# Altium PCB PCB_DBS_Module-v1.0.PcbDoc (part 1 of 4)
Units mil, origin at the board's own origin, x right, y up, seen from the top; angles counter-clockwise.
Board outline 5571 x 4173 mil, 4 copper layers (Top Layer, PWR + Signal, GND + Signal, Bottom Layer), stack 61.653 mil thick; 149 components, 108 nets, 494 pads, 359 vias.
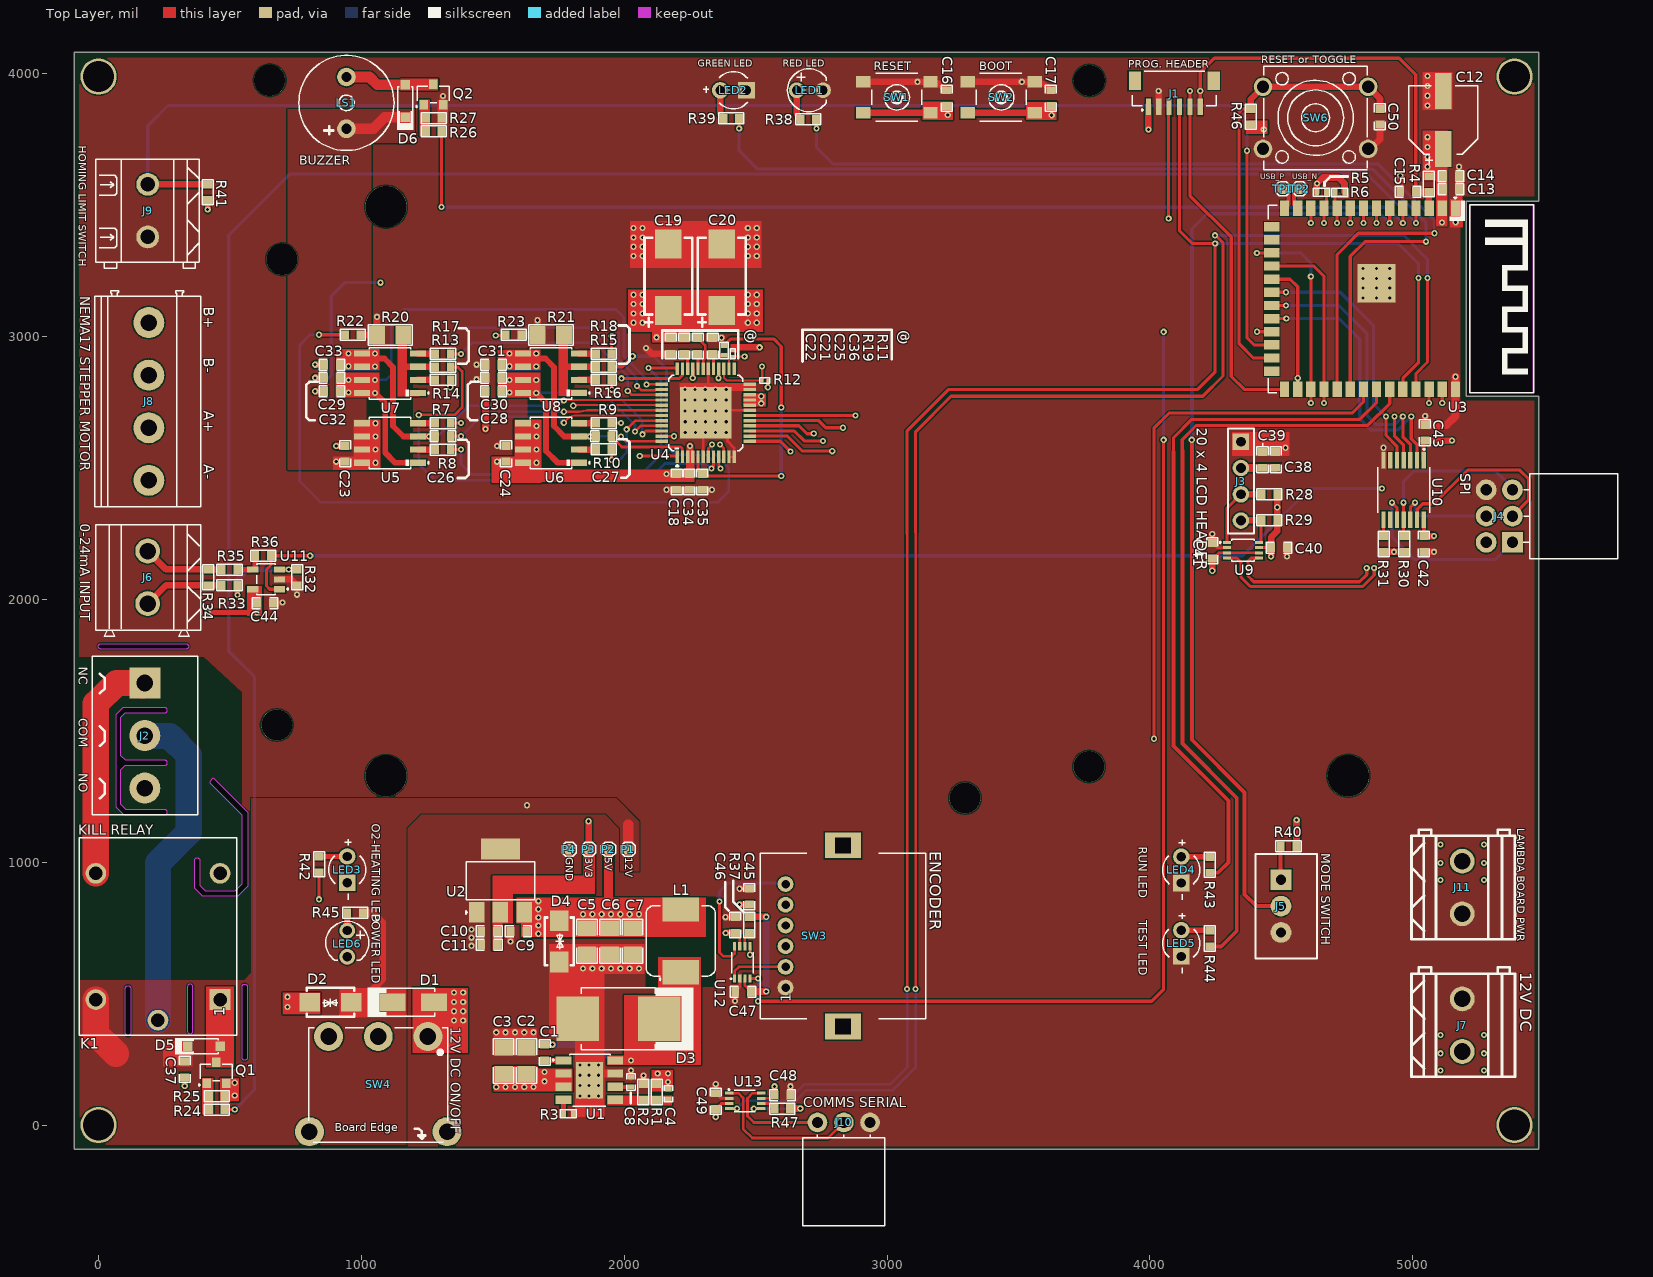
[diagram p0: Top Layer view]
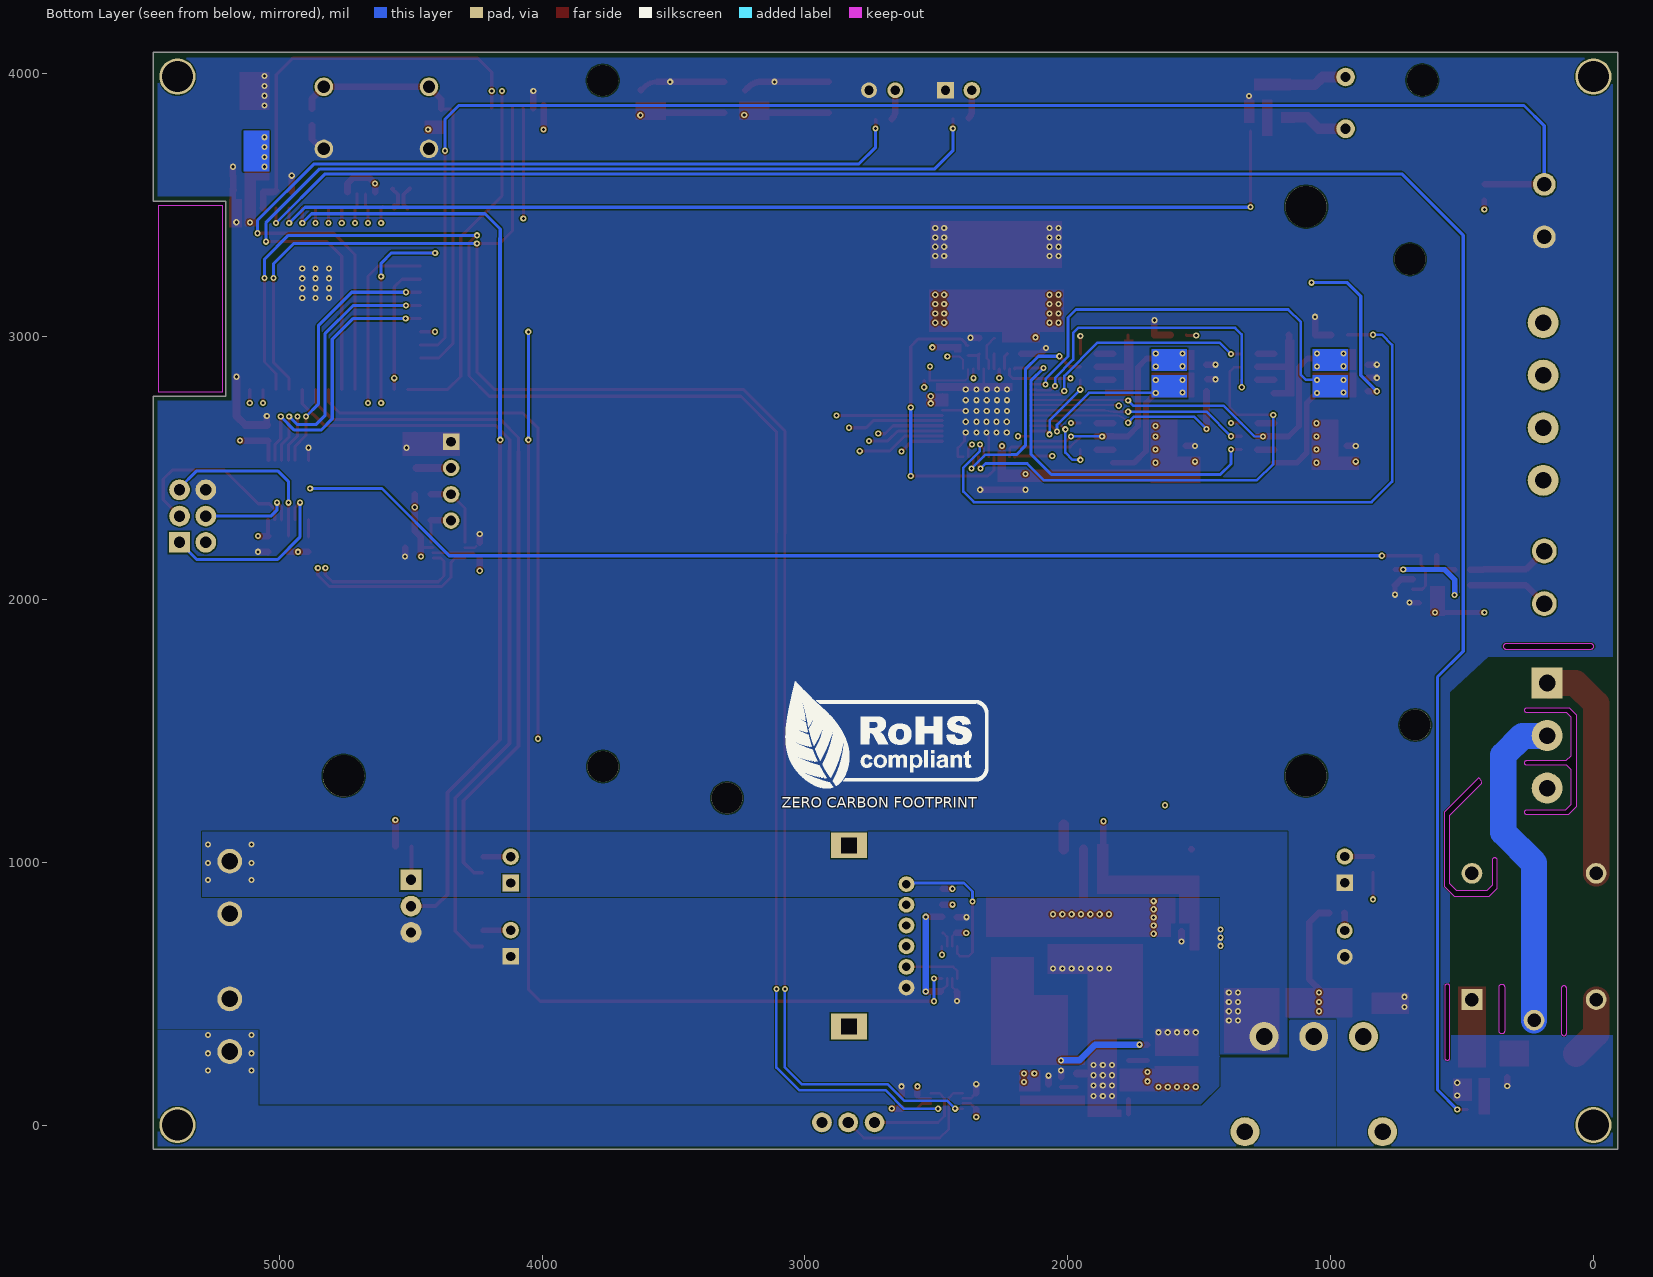
[diagram p1: Bottom Layer view, seen from below]
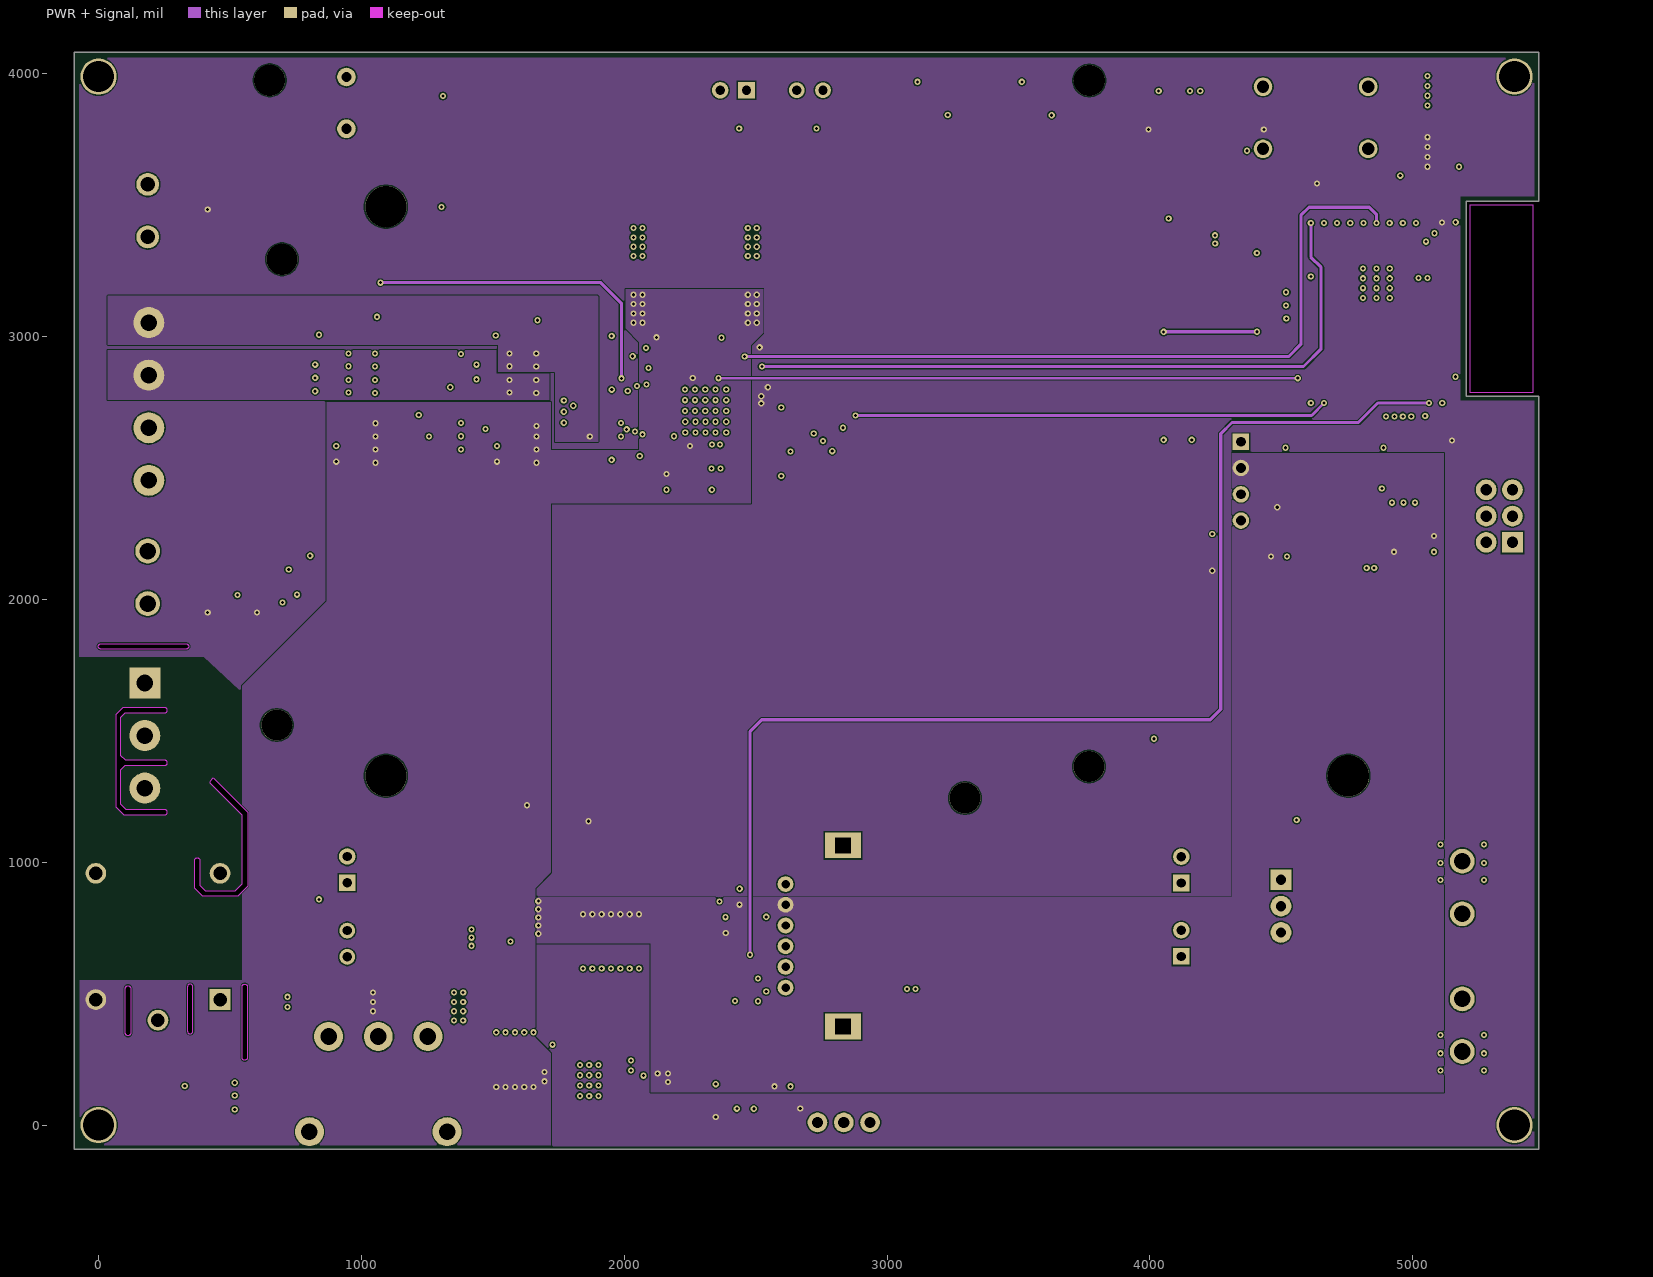
[diagram p2: PWR + Signal]
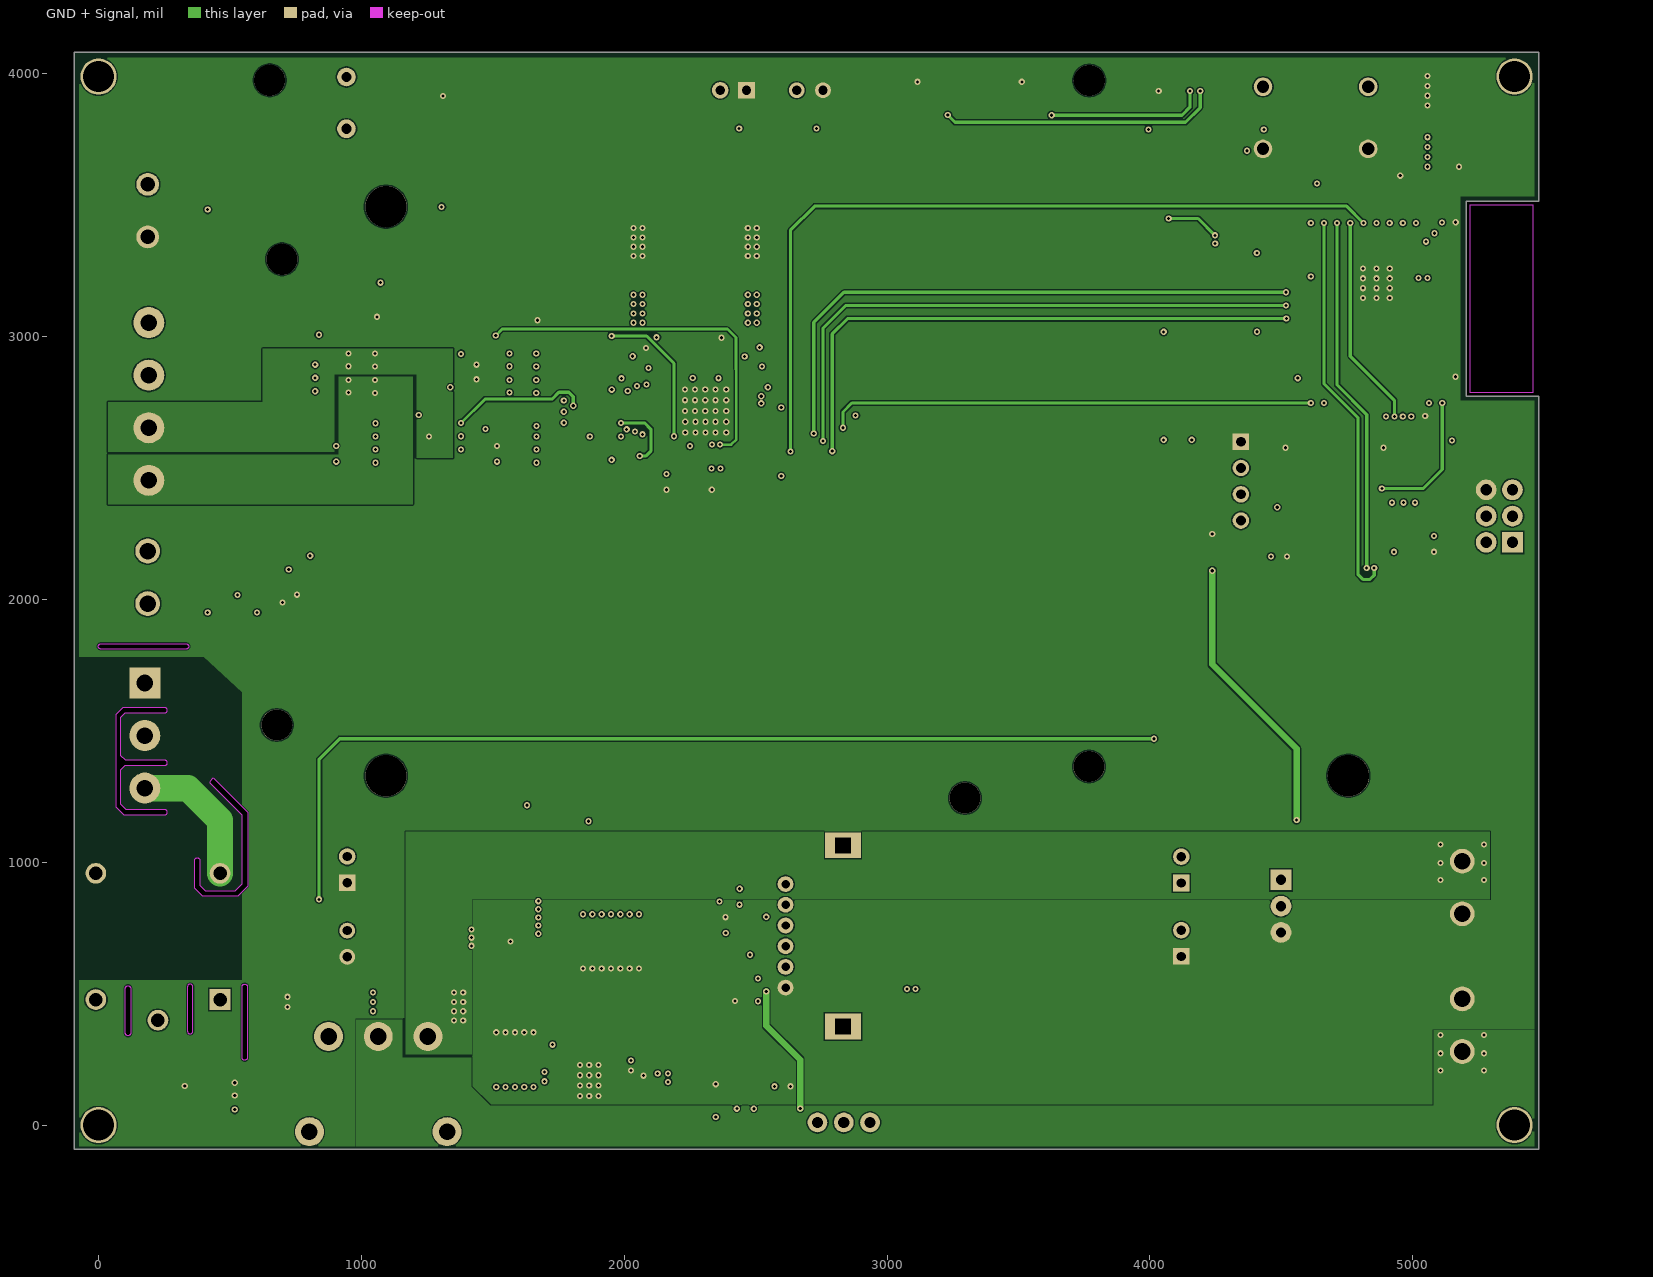
[diagram p3: GND + Signal]
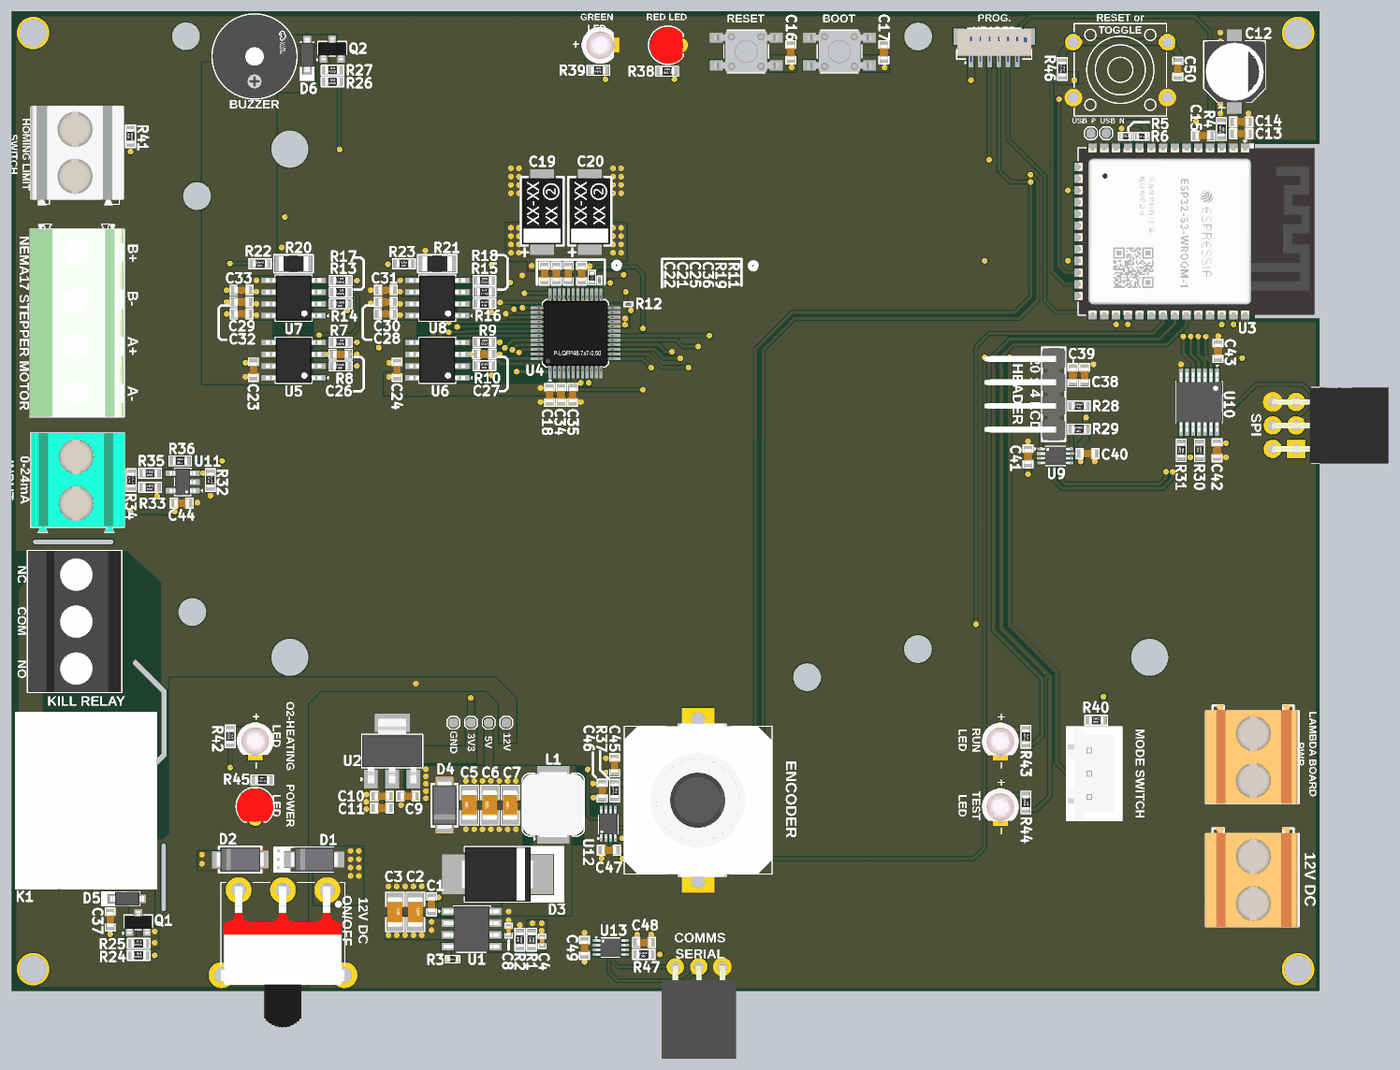
[diagram p5: 3D render of the assembled board from above, using the file's embedded part models]

## Layer stack, top to bottom
Top Solder: solder mask 0.709, Solder Resist, Dk 3.5
Top Layer: signal copper 1.378
Dielectric 2: prepreg 7.992, PP-006, Dk 4.4
PWR + Signal: signal copper 1.181
Dielectric 1: core 40.551, FR-4, Dk 4.6
GND + Signal: signal copper 1.181
Dielectric 3: prepreg 7.992, PP-006, Dk 4.4
Bottom Layer: signal copper 1.378
Bottom Solder: solder mask 0.709, Solder Resist, Dk 3.5

## Board outline
-92,-92 -92,4081 5479,4081 5479,3515 5204,3515 5204,2773 5479,2773 5479,-92
cut-out: 396,871 365.23,901.77 365.23,1006.95 cw(c375.23,1006.95) 375.23,1016.95 cw(c375.23,1006.95) 385.23,1006.95 385.23,912 405.23,892 520,892 545.77,917.77 545.77,1178.81 423.98,1300.59 cw(c444.24,1300.59) 429.92,1314.92 436.5,1321.5 568,1190 568,909 530,871
cut-out: 85.17,1220.83 85.17,1352.17 101.17,1368.17 251.76,1368.17 ccw(c251.76,1378.17) 261.76,1378.17 ccw(c251.76,1378.17) 251.76,1388.17 103,1388.17 85.17,1406 85.17,1552.17 101.17,1568.17 251.76,1568.17 ccw(c251.76,1578.17) 261.76,1578.17 ccw(c251.76,1578.17) 251.76,1588.17 92.17,1588.17 65.17,1561.17 65.17,1210.83 95.83,1180.17 251.76,1180.17 ccw(c251.76,1190.17) 261.76,1190.17 ccw(c251.76,1190.17) 251.76,1200.17 105.83,1200.17
cut-out: 555.77,246.59 cw(c555.77,256.59) 545.77,256.59 545.77,526.64 cw(c555.77,526.64) 555.77,536.64 cw(c555.77,526.64) 565.77,526.64 565.77,256.59 cw(c555.77,256.59)
cut-out: 348.23,536.64 ccw(c348.23,526.64) 338.23,526.64 338.23,356.59 ccw(c348.23,356.59) 348.23,346.59 ccw(c348.23,356.59) 358.23,356.59 358.23,526.64 ccw(c348.23,526.64)
cut-out: 112.01,340 cw(c112.01,350) 102.01,350 102.01,520.05 cw(c112.01,520.05) 112.01,530.05 cw(c112.01,520.05) 122.01,520.05 122.01,350 cw(c112.01,350)
cut-out: 8.95,1810.99 cw(c8.95,1820.99) -1.05,1820.99 cw(c8.95,1820.99) 8.95,1830.99 333,1830.99 cw(c333,1820.99) 343,1820.99 cw(c333,1820.99) 333,1810.99

## Design rules (kind name [scope] priority, off if disabled: settings)
BoardOutlineClearance [All] p1: gap=0 ignorepadtopadclearanceinfootprint=FALSE except(10: Poly-OutlineEdge)
Clearance [All] p1: gap=5 ignorepadtopadclearanceinfootprint=FALSE except(4: Arc-SMDPad Track-SMDPad SMDPad-SMDPad)
ComponentClearance [All] p1: gap=5 collisioncheckmode=3 verticalgap=5 showdistances=FALSE
DiffPairsRouting [All] p1: maxlimit=5 minlimit=5 mostfreqgap=5 toplayer_minwidth=8.69 toplayer_maxwidth=8.69 toplayer_prefwidth=8.69 midlayer1_minwidth=4.58 midlayer1_maxwidth=4.58 midlayer1_prefwidth=4.58 midlayer2_minwidth=4.58 midlayer2_maxwidth=4.58 midlayer2_prefwidth=4.58 bottomlayer_minwidth=8.69 bottomlayer_maxwidth=8.69 bottomlayer_prefwidth=8.69 impedanceprofiledriven=TRUE impedanceprofileid={7591B774-6EB5-4B82-8191-53E592D77F2E} impedanceprofilevalue=90.000000 maxuncoupledlength=500
Height [All] p1: minheight=0 maxheight=10000 prefheight=500
HoleSize [All] p1: absolutevalues=TRUE maxlimit=1000 minlimit=1 maxpercent=80.000 minpercent=20.000
HoleToHoleClearance [All] p1: gap=1 allowstackedmicrovias=TRUE
MatchedLengths "Schematic Matched Net Lengths" [InNetClass('USB_PROGRAM')] p1: tolerance=50 checknetsindiffpair=TRUE checkdiffpairvsdiffpair=FALSE checkxsignals=FALSE checkothers=FALSE
MaxMinImpedance "Schematic Impedance Constraint" [InNetClass('USB_PROGRAM')] p1: minimum=85.00 maximum=90.00
MinimumSolderMaskSliver [All] p1: minsoldermaskwidth=0
PolygonConnect [All] p1: connectstyle=Direct reliefconductorwidth=10 reliefentries=4 polygonreliefangle="90 Angle" airgapwidth=10
RoutingVias [All] p1: holewidth=11.81 width=23.62 viastyle="Through Hole" minholewidth=11.81 minwidth=23.62 maxholewidth=11.81 maxwidth=23.62
SilkToSilkClearance [All] p1: silktosilkclearance=0
SilkToSolderMaskClearance [IsPad] p1: minsilkscreentomaskgap=0 clearancetoexposedcopper=TRUE
SolderMaskExpansion SolderMaskExpansion_1 [IsVia] p1: expansion=4 istentingtop=FALSE soldermaskfromhole=TRUE
SolderMaskExpansion [Not IsVia] p2: expansion=4 istentingtop=FALSE
UnRoutedNet [All] p1: checkbadconnections=TRUE
Width [All] p1: maxlimit=100 minlimit=8 preferedwidth=12
21 further rules are at their usual default settings.

## Classes and differential pairs
differential pair class USB_PROGRAM_LINES: USB_D
net class USB_PROGRAM: USB_D_N USB_D_P
component class U_Stepper-Driver-Sheet: C18 C19 C20 C21 C22 C23 C24 C25 C26 C27 C28 C29 C30 C31 C32 C33 C34 C35 C36 R7 R8 R9 R10 R11 R12 R13 R14 R15 R16 R17 R18 R19 R20 R21 R22 R23 U4 U5 U6 U7 U8
component class U_Relay-Sheet: C37 D5 J2 K1 Q1 R24 R25
component class U_Power-Sheet: C1 C2 C3 C4 C5 C6 C7 C8 C9 C10 C11 D1 D2 D3 D4 L1 P1 P2 P3 P4 R1 R2 R3 U1 U2
component class U_Optical-Encoder-Sheet: C45 C46 C47 R37 SW3 U12
component class U_Controller-Sheet: C12 C13 C14 C15 C16 C17 J1 R4 R5 R6 SW1 SW2 TP1 TP2 U3
component class U_Connectors-SW-LEDs-Sheet: C48 C49 C50 J5 J7 J8 J9 J10 J11 LED1 LED2 LED3 LED4 LED5 LED6 R38 R39 R40 R41 R42 R43 R44 R45 R46 R47 SW4 SW6 U13
component class U_Buzzer-Sheet: D6 LS1 Q2 R26 R27
component class U_20x4-Display-Sheet: C38 C39 C40 C41 J3 R28 R29 U9
component class U_01M21V00-Sensor-Sheet: C42 C43 J4 R30 R31 U10
component class U_0-24mA-Input-Sheet: C44 J6 R32 R33 R34 R35 R36 U11
differential pair USB_D: +USB_D_P -USB_D_N

## Components (designator, comment, footprint, x,y, rotation, side; value= is the part's Value field where it differs from the comment)
C1 "100nF" Cap-0603 1697,276 r270 top locked
C2 "10uF" Cap-1206 1628,244 r270 top locked
C3 "10uF" Cap-1206 1541,244 r270 top locked
C4 "390pF" Cap-0402 2168,119 r90 top locked
C5 "47uF" Cap-1206 1858,699 r90 top locked
C6 "47uF" Cap-1206 1945,699 r90 top locked
C7 "47uF" Cap-1206 2032,699 r90 top locked
C8 "47nF" Cap-0402 2025,164 r270 top locked
C9 "1uF" Cap-0603 1597,737 r0 top locked
C10 "1uF" Cap-0603 1486,737 r0 top locked
C11 "4.7uF" Cap-0603 1486,686 r0 top locked
C12 "47uF" RVT1H470M0607 5116,3824.24 r90 top locked
C13 "22uF" Cap-0603 5145,3560 r180 top locked
C14 "100nF" Cap-0603 5145,3610 r180 top locked
C15 "1uF" Cap-0603 4982,3551 r0 top locked
C16 "100nF" Cap-0603 3227,3907 r90 top locked
C17 "100nF" Cap-0603 3623,3907 r90 top locked
C18 "100nF" Cap-0603 2199,2447 r90 top locked
C19 "100uF" Case-E 2168,3099 r90 top locked
C20 "100uF" Case-E 2371,3099 r90 top locked
C21 "100nF" Cap-0603 2228,2964 r270 top locked
C22 "100nF" Cap-0603 2177,2964 r270 top locked
C23 "470nF" Cap-0603 938,2554 r90 top locked
C24 "470nF" Cap-0603 1550,2554 r90 top locked
C25 "22nF" Cap-0603 2279,2964 r270 top locked
C26 "220nF" Cap-0603 1310,2620.5 r180 top locked
C27 "220nF" Cap-0603 1922,2621 r180 top locked
C28 "1nF" Cap-0603 1502,2843 r180 top locked
C29 "220nF" Cap-0603 888,2792 r0 top locked
C30 "220nF" Cap-0603 1502,2792 r0 top locked
C31 "1nF" Cap-0603 1502,2893 r180 top locked
C32 "1nF" Cap-0603 888,2843 r180 top locked
C33 "1nF" Cap-0603 888,2893 r180 top locked
C34 "2.2uF" CAP-0603 2248,2447 r90 top locked
C35 "2.2uF" CAP-0603 2297,2447 r90 top locked
C36 "0.47uF" Cap-0603 2336,2964 r270 top locked
C37 "100nF" Cap-0603 328,212 r270 top locked
C38 "22uF" Cap-0603 4478,2531 r270 top locked
C39 "100nF" Cap-0603 4428,2531 r270 top locked
C40 "100nF" Cap-0603 4491,2197 r0 top locked
C41 "100nF" Cap-0603 4237,2185 r90 top locked
C42 "100nF" Cap-0603 5042,2211 r270 top locked
C43 "100nF" Cap-0603 5046,2634 r90 top locked
C44 "100nF" Cap-0603 633,1986 r180 top locked
C45 "100nF" Cap-0603 2476,869 r90 top locked
C46 "100nF" Cap-0603 2423,761 r90 top locked
C47 "100nF" Cap-0603 2452,507 r180 top locked
C48 "100nF" Cap-0603 2602,114 r0 top locked
C49 "100nF" Cap-0603 2348,91 r90 top locked
C50 "100nF" Cap-0603 4875,3836 r270 top locked
D1 "SS56" SMA 1198,467 r0 top locked
D2 "SMAJ12CA" "SMA Bi Directional" 882,467 r0 top locked
D3 "B540C-13-F" SMC 1978,404 r180 top locked value=300pF
D4 "SMAJ5.0CA" "SMA Bi Directional" 1752,699 r90 top locked
D5 "1N4148W-7-F" SOD-123 401,300 r180 top locked value=2pF
D6 "1N4148W-7-F" SOD-123 1167,3896 r270 top locked value=2pF
J1 "Voltlink Target" "Voltlink Target" 4092.61,3923.3 r0 top locked
J2 "DB128L-5.08-3P-BK-S" DB128L-5.08-3P-BK-S 176,1482 r270 top locked
J3 "PZ2.54-1*4-WZ" PZ2.54-1*4-WZ 4346,2450 r270 top locked
J4 "PM254-2-03-W-8.5" "HDR 2x3 right angle Female (2.54mm)" 5329,2317 r90 top locked
J5 "B3B-XH-A(LF)(SN)" B3B-XH-A(LF)(SN)_ 4498.4,783 r270 top locked
J6 "DB128L-5.08-2P-GN-S" DB128L-5.08-2P-GN-S 187,2084 r90 top locked
J7 "DB128L-5.08-2P-OG-S" DB128L-5.08-2P-OG-S 5188,380 r270 top locked
J8 "DB128V-5.08-4P-GN-S" DB128V-5.08-4P-GN-S 191,2753 r270 top locked
J9 "DB128L-5.08-2P-GY-S" DB128L-5.08-2P-GY-S 187,3479 r270 top locked
J10 "PM254-1-03-W-8.5" "HDR 1x3 Female Right angle (2.54mm)" 2835,10 r0 top locked
J11 "DB128L-5.08-2P-OG-S" DB128L-5.08-2P-OG-S 5188,904 r270 top locked
K1 "HF3FA/012-ZSTF(136)(257)" HF3FA/012-ZSTF(136)(257) 225.78,678.47 r90 top locked
L1 "5.6uH" FXL0630-5R6-M 2215,701 r90 top locked
LED1 "RED" "TH LED Red 3MM" 2706,3937 r0 top locked
LED2 "Emerald" "TH LED 3mm_" 2415,3937 r180 top locked
LED3 "LTL17KFL5D-012A" "TH LED 3mm_" 946,972 r90 top locked
LED4 "Emerald" "TH LED 3mm_" 4119,971 r90 top locked
LED5 "LTL17KFL5D-012A" "TH LED 3mm_" 4119,691.56 r90 top locked
LED6 "RED" "TH LED Red 3MM" 946,690 r270 top locked
LS1 "FMB09A12-12V" FMB09A12-12V 943,3889 r90 top locked
P1 "TEST POINT 0.5mm Dia" "Test-point - 0.5mm" 2015,1050 r270 top locked
P2 "TEST POINT 0.5mm Dia" "Test-point - 0.5mm" 1940,1050 r270 top locked
P3 "TEST POINT 0.5mm Dia" "Test-point - 0.5mm" 1865,1050 r270 top locked
P4 "TEST POINT 0.5mm Dia" "Test-point - 0.5mm" 1790,1050 r270 top locked
Q1 "MMBT2222A-7-F" SOT-23 448,199 r0 top locked
Q2 "MMBT2222A-7-F" SOT-23 1274,3921 r0 top locked
R1 "68K" Res-0603 2123,126 r90 top locked
R2 "12K" Res-0603 2073,126 r270 top locked value=12kR
R3 "45.3k" Res-0402 1787,43 r180 top locked value=45.3kR
R4 "10K" Res-0603 5061,3580 r90 top locked
R5 "4.7K" Res-0402 4653,3549 r180 top locked
R6 "4.7K" Res-0402 4722,3549 r0 top locked
R7 "22R" Res-0603 1310,2671 r180 top locked
R8 "22R" Res-0603 1310,2570 r0 top locked
R9 "22R" Res-0603 1922,2671 r180 top locked
R10 "22R" Res-0603 1922,2571 r0 top locked
R11 "47K" Res-0201 2413,2935 r270 top locked value=47kR
R12 "47K" Res-0201 2535,2833 r180 top locked value=47kR
R13 "22R" Res-0603 1310,2934 r180 top locked
R14 "22R" Res-0603 1310,2835 r0 top locked
R15 "22R" Res-0603 1922,2934 r180 top locked
R16 "22R" Res-0603 1922,2836 r0 top locked
R17 "47R" Res-0603 1310,2884.5 r180 top locked
R18 "47R" Res-0603 1922,2885 r180 top locked
R19 "2.2R" Res-0402 2380,2947 r270 top locked
R20 "75mR" Res-1206 1109,3006 r0 top locked
R21 "75mR" Res-1206 1721,3006 r0 top locked
R22 "47R" Res-0603 967,3006 r0 top locked
R23 "47R" Res-0603 1579,3006 r0 top locked
R24 "470R" Res-0603 449.5,59 r180 top locked
R25 "10K" Res-0603 449.5,110 r180 top locked
R26 "470R" Res-0603 1275,3781 r180 top locked
R27 "10K" Res-0603 1275,3831 r180 top locked
R28 "10K" Res-0603 4454,2400 r0 top locked
R29 "10K" Res-0603 4454,2301 r0 top locked
R30 "10K" Res-0603 4967,2211 r270 top locked
R31 "10K" Res-0603 4889,2211 r90 top locked
R32 "100K" Res-0603 755,2084 r270 top locked
R33 "100K" Res-0603 498,2053 r0 top locked
R34 "120R" Res-0603 418,2084 r270 top locked
R35 "100K" Res-0603 498,2113 r0 top locked
R36 "100K" Res-0603 626,2166 r0 top locked
R37 "10K" Res-0603 2476,761 r90 top locked
R38 "130R" Res-0603 2700,3826 r180 top locked
R39 "15R" Res-0603 2407,3830 r180 top locked
R40 "10K" Res-0603 4527.28,1060.73 r0 top locked
R41 "10K" Res-0603 415,3549 r270 top locked
R42 "130R" Res-0603 839,992 r90 top locked
R43 "15R" Res-0603 4228,990 r90 top locked
R44 "130R" Res-0603 4228,710 r90 top locked
R45 "1.2K" Res-0603 976,807 r180 top locked
R46 "10K" Res-0603 4383,3836 r90 top locked
R47 "10K" Res-0603 2601,63 r0 top locked
SW1 "TS-1109S-C-B" TS-1109S-C-B 3037,3910 r180 top locked
SW2 "TS-1109S-C-B" TS-1109S-C-B 3434,3910 r180 top locked
SW3 "REC16B25-201-C" REC16B25-201-C 2832,720 r90 top locked
SW4 "SS-12D11G5R" SS-12D11G5R_ 1252.98,337 r180 top locked
SW6 "SKQBAQA010" SKQBAQA010 4630,3832 r0 top locked
TP1 "TEST POINT 0.5mm Dia" "Test-point - 0.5mm" 4505,3562 r0 top locked
TP2 "TEST POINT 0.5mm Dia" "Test-point - 0.5mm" 4570,3562 r0 top locked
U1 "LMR16030SDDAR" 8-SO-EP_ 1867,171 r0 top locked
U2 "LDL1117S33R" "SOT- 223" 1529,930.08 r0 top locked
U3 "ESP32-S3-WROOM-1-N8R2" "41-SMD Module" 4812.39,3143.49 r270 top locked
U4 "TMC2160A-TA-T" 48-TQFP-EP(7x7) 2309.84,2709.68 r90 top locked
U5 "AOSD62666E" SOIC-8 1109,2595 r180 top locked
U6 "AOSD62666E" SOIC-8 1721,2595 r180 top locked
U7 "AOSD62666E" SOIC-8 1109,2860 r180 top locked
U8 "AOSD62666E" SOIC-8 1721,2860 r180 top locked
U9 "TXS0102DCUR" VSSOP-8(3.1x2.1) 4354,2187 r0 top locked
U10 "TXU0304PWR" 14-TSSOP 4965,2416 r270 top locked
U11 "TP5591-TR" SOT-23-5 637,2076 r180 top locked
U12 "TXB0102DCUT" TXB0102DCUT 2449.16,618.98 r90 top locked
U13 "TXB0102DCUT" TXB0102DCUT 2460,92 r0 top locked

## Footprints (in the part's own frame and the unit in brackets; to place one, negate y for a bottom-side part, rotate by r counter-clockwise, add the part's x,y. Pads: shape width x height; smd on the part's side, far side on the other; paste and mask are expansions set on the pad)
8-SO-EP_ [mm]
  rect 1.505x0.802 smd: 1(-2.497,1.905) 2(-2.497,0.635) 3(-2.497,-0.635) 4(-2.497,-1.905) 5(2.498,-1.905) 6(2.498,-0.635) 7(2.498,0.635) 8(2.498,1.905)
  rect 2.613x3.502 smd: 9(0,0)
  silkscreen extent -3.53,-2.51 2.03,2.51, body extent -3,-2.45 3,2.45, height 1.7
14-TSSOP [mm]
  rect 1.57x0.41 smd: 1(-2.87,1.95) 2(-2.87,1.3) 3(-2.87,0.65) 4(-2.87,0) 5(-2.87,-0.65) 6(-2.87,-1.3) 7(-2.87,-1.95) 8(2.87,-1.95) 9(2.87,-1.3) 10(2.87,-0.65) 11(2.87,0) 12(2.87,0.65) 13(2.87,1.3) 14(2.87,1.95)
  silkscreen extent -3.98,-2.5 2.2,2.5, body extent -3.2,-2.5 3.2,2.5, height 1.2
"41-SMD Module" [mm]
  rect 1.5x0.9 smd: 1(-8.75,8.88) 2(-8.75,7.61) 3(-8.75,6.34) 4(-8.75,5.07) 5(-8.75,3.8) 6(-8.75,2.53) 7(-8.75,1.26) 8(-8.75,-0.01) 9(-8.75,-1.28) 10(-8.75,-2.55) 11(-8.75,-3.82) 12(-8.75,-5.09) 13(-8.75,-6.36) 14(-8.75,-7.63) 27(8.75,-7.63) 28(8.75,-6.36) 29(8.75,-5.09) 30(8.75,-3.82) 31(8.75,-2.55) 32(8.75,-1.28) 33(8.75,-0.01) 34(8.75,1.26) 35(8.75,2.53) 36(8.75,3.8) 37(8.75,5.07) 38(8.75,6.34) 39(8.75,7.61) 40(8.75,8.88)
  rect 0.9x1.5 smd: 15(-6.98,-8.88) 16(-5.71,-8.88) 17(-4.44,-8.88) 18(-3.17,-8.88) 19(-1.9,-8.88) 20(-0.63,-8.88) 21(0.64,-8.88) 22(1.91,-8.88) 23(3.18,-8.88) 24(4.45,-8.88) 25(5.72,-8.88) 26(6.99,-8.88)
  rect 3.7x3.7 smd: 41(-1.5,1.26)
  Keep-Out Layer region: -9.042,10.284 9.042,10.284 9.042,16.38 -9.042,16.38
  silkscreen extent -9.8,-9.2 9.09,16.43, body extent -9.01,-9.14 9.01,16.37, height 3.16
48-TQFP-EP(7x7) [mm]
  rect 1.22x0.32 smd: 1(-4.25,2.75) 2(-4.25,2.25) 3(-4.25,1.75) 4(-4.25,1.25) 5(-4.25,0.75) 6(-4.25,0.25) 7(-4.25,-0.25) 8(-4.25,-0.75) 9(-4.25,-1.25) 10(-4.25,-1.75) 11(-4.25,-2.25) 12(-4.25,-2.75) 25(4.25,-2.75) 26(4.25,-2.25) 27(4.25,-1.75) 28(4.25,-1.25) 29(4.25,-0.75) 30(4.25,-0.25) 31(4.25,0.25) 32(4.25,0.75) 33(4.25,1.25) 34(4.25,1.75) 35(4.25,2.25) 36(4.25,2.75)
  rect 0.32x1.22 smd: 13(-2.75,-4.25) 14(-2.25,-4.25) 15(-1.75,-4.25) 16(-1.25,-4.25) 17(-0.75,-4.25) 18(-0.25,-4.25) 19(0.25,-4.25) 20(0.75,-4.25) 21(1.25,-4.25) 22(1.75,-4.25) 23(2.25,-4.25) 24(2.75,-4.25) 37(2.75,4.25) 38(2.25,4.25) 39(1.75,4.25) 40(1.25,4.25) 41(0.75,4.25) 42(0.25,4.25) 43(-0.25,4.25) 44(-0.75,4.25) 45(-1.25,4.25) 46(-1.75,4.25) 47(-2.25,4.25) 48(-2.75,4.25)
  rect 5x5 smd: 49(0,0)
  silkscreen extent -5.16,-3.58 3.66,3.58, body extent -4.51,-4.51 4.49,4.49, height 1.43
B3B-XH-A(LF)(SN)_ [mm]
  rect 2x2 hole 1: 1(-3.81,0)
  round 2 hole 1: 2(-1.27,0) 3(1.27,0)
  silkscreen extent -6.32,-2.46 3.78,3.48, body extent -6.22,-2.36 3.68,3.39, height 7
Cap-0402 [mil]
  rect 18x25 smd mask+2.36: 1(-18.5,0) 2(18.5,0)
  silkscreen extent -31,-16 31,16, body extent -20,-10 20,10, height 19
Cap-0603 [mil]
  rect 30x35 smd mask+2.36: 1(-30,0) 2(30,0)
  silkscreen extent -49,-21 49,21, body extent -32,-16 31,16, height 34
CAP-0603 [mil]
  rect 30x35 smd mask+2.36: 1(-30,0) 2(30,0)
  silkscreen extent -49,-21 49,21, body extent -32,-16 31,16, height 34
Cap-1206 [mil] "SMD 1206"
  rect 60x70 smd: 1(-50,0) 2(50,0)
  silkscreen extent -84,-39 84,39, body extent -63,-31 63,32, height 39
Case-E [mm]
  rect 2.79x2.57 smd: 1(0,0) 2(6.44,0)
  silkscreen extent -1.56,-2.31 7.03,2.31, body extent -0.27,-2.21 6.92,2.21, height 2.88
DB128L-5.08-2P-GN-S [mm]
  round 2.4 hole 1.6: 1(-2.54,0) 2(2.54,0)
  silkscreen extent -5.7,-5.1 5.1,5, body extent -5.68,-5.12 5.08,4.88, height 14
DB128L-5.08-2P-GY-S [mm]
  round 2.2 hole 1.4 paste+0 mask+0.051: 1(-2.54,0) 2(2.54,0)
  silkscreen extent -4.99,-5 5.59,5, body extent -5.07,-5 5.7,5, height 14.1
DB128L-5.08-2P-OG-S [mm]
  round 2.4 hole 1.6 paste+0 mask+0.051: 1(-2.54,0) 2(2.54,0)
  silkscreen extent -5.59,-4.91 4.99,5.1, body extent -5.68,-4.98 5.08,5.02, height 14
DB128L-5.08-3P-BK-S [mm]
  rect 3x3 hole 1.6: 1(-5.08,0)
  round 3 hole 1.6: 2(0,0) 3(5.08,0)
  silkscreen extent -7.67,-5.08 7.67,5.13, body extent -7.59,-5.03 7.65,5.07, height 10.1
DB128V-5.08-4P-GN-S [mm]
  round 3 hole 1.6 paste+0 mask+0.05: 1(-7.62,0) 2(-2.54,0) 3(2.54,0) 4(7.62,0)
  silkscreen extent -10.72,-5.2 10.16,5, body extent -10.74,-5.25 10.15,4.95, height 14
FMB09A12-12V [mm]
  round 1.8 hole 1 copper offset 0,0 paste+0 mask+0.051: 1(-2.5,0)
  round 1.8 hole 1 paste+0 mask+0.051: 2(2.5,0)
  silkscreen extent -4.6,-4.6 4.6,4.6, body extent -4.5,-4.5 4.5,4.5, height 5.51
FXL0630-5R6-M [mm]
  rect 2.35x3.5 smd: 1(-3.025,0) 2(3.025,0)
  silkscreen extent -3.84,-3.35 3.4,3.35, body extent -3.5,-3.3 3.5,3.3, height 2.6
"HDR 1x3 Female Right angle (2.54mm)" [mm]
  round 1.9 hole 1.1 paste+0 mask+0.05: 1(-2.54,0) 2(0,0) 3(2.54,0)
  silkscreen extent -3.95,-10 3.95,-1.18, body extent -4.01,-9.93 4.02,0.22, height 2.5
"HDR 2x3 right angle Female (2.54mm)" [mm]
  rect 2x2 hole 1.1 paste+0 mask+0.05: 1(-2.54,-1.27)
  round 2 hole 1.1 paste+0 mask+0.05: 2(-2.54,1.27) 3(0,-1.27) 4(0,1.27) 5(2.54,-1.27) 6(2.54,1.27)
  silkscreen extent -4.11,-11.43 4.11,-2.34, body extent -4.12,-11.24 4.12,1.46, height 5
HF3FA/012-ZSTF(136)(257) [mm]
  rect 2x2 hole 1.3 paste+0 mask+0.051: 1(-5.1,-6)
  round 2 hole 1.3 paste+0 mask+0.051: 2(7.1,-6) 3(7.1,6) 4(-5.1,6) 5(-7.1,0)
  silkscreen extent -8.55,-7.62 10.55,7.62, body extent -8.5,-7.6 10.5,7.61, height 15.5
PZ2.54-1*4-WZ [mm]
  rect 1.6x1.6 hole 0.95: 1(-3.81,0)
  round 1.6 hole 0.95: 2(-1.27,0) 3(1.27,0) 4(3.81,0)
  silkscreen extent -5.08,-1.27 5.08,1.27, body extent -5.01,-7.47 5.02,1.27, height 4.34
REC16B25-201-C [mm]
  round 1.524 hole 0.82: 1(-5,5.55) 2(-3,5.55) 3(-1,5.55) 4(1,5.55) 5(3,5.55) 6(5,5.55)
  rect 2.5x3.5 hole 1.5 square: 7(-8.75,0) 7(8.75,0)
  silkscreen extent -8,-8 8,8, body extent -8.3,-7.95 8.3,8.05, height 35
Res-0201 [mm]
  rect 0.27x0.37 smd mask+0.055: 1(-0.275,0) 2(0.275,0)
  silkscreen extent -0.48,-0.25 0.48,0.25, body extent -0.3,-0.15 0.3,0.15, height 0.29
Res-0402 [mil]
  rect 18x25 smd mask+2.17: 1(-18.5,0) 2(18.5,0)
  silkscreen extent -32,-17 32,16, body extent -23,-11 23,11, height 16
Res-0603 [mil]
  rect 30x35 smd: 1(-30,0) 2(30,0)
  silkscreen extent -48,-21 48,21, body extent -31,-17 31,17, height 18
Res-1206 [mil]
  rect 60x70 smd: 1(-50,0) 2(50,0)
  silkscreen extent -84,-39 84,39, body extent -63,-31 63,31, height 24
RVT1H470M0607 [mm]
  rect 3.5x1.6 smd: 1(-2.8,0) 2(2.8,0)
  silkscreen extent -4.27,-3.33 3.32,3.33, body extent -3.31,-3.33 3.29,3.27, height 7.94
SKQBAQA010 [mm]
  round 1.8 hole 1.2 paste+0 mask+0.051: 1(-5.08,3) 2(5.08,3) 3(-5.08,-3) 4(5.08,-3)
  silkscreen extent -5,-5 5,5
SMA [mm]
  rect 2.5x1.7 smd: 1(-2,0) 2(2,0)
  silkscreen extent -4.44,-1.42 2.06,1.42, body extent -2.6,-1.3 2.6,1.3, height 2.4
"SMA Bi Directional" [mm]
  rect 2x1.8 smd paste+0 mask+0.051: 1(-2,0) 2(2,0)
  silkscreen extent -2.3,-1.4 2.3,1.4, body extent -2.6,-1.3 2.6,1.3, height 2.4
SMC [mm]
  rect 4.1x4.3 smd: 1(-3.95,0) 2(3.95,0)
  silkscreen extent -7.24,-3.05 3.58,3.05, body extent -3.9,-2.95 3.9,2.95, height 2.41
SOD-123 [mm]
  rect 0.95x0.9 smd: 1(-1.575,0) 2(1.575,0)
  silkscreen extent -1.37,-0.8 2.82,0.8, body extent -1.82,-0.78 1.83,0.78, height 1.5
SOIC-8 [mm]
  rect 1.55x0.6 smd: 1(-2.7,1.905) 2(-2.7,0.635) 3(-2.7,-0.635) 4(-2.7,-1.905) 5(2.7,-1.905) 6(2.7,-0.635) 7(2.7,0.635) 8(2.7,1.905)
  silkscreen extent -3.76,-2.49 1.99,2.49, body extent -3,-2.45 3,2.45, height 1.7
SOT-23 [mm] "TRANS NPN 40V 0.6A SOT23"
  rect 0.82x0.92 smd: 1(-0.95,-1) 2(0.95,-1) 3(0,1)
  silkscreen extent -1.68,-1.3 1.55,0.81, body extent -1.5,-1.25 1.5,1.25, height 1.05
SOT-23-5 [mm]
  rect 1.1x0.6 smd: 1(-1.3,0.95) 2(-1.3,0) 3(-1.3,-0.95) 4(1.3,-0.95) 5(1.3,0.95)
  silkscreen extent -2.13,-1.5 0.88,1.5, body extent -1.4,-1.45 1.4,1.45, height 1.45
"SOT- 223" [mm]
  rect 1.5x2 smd: 1(-2.3,-3.05) 2(0,-3.05) 3(2.3,-3.05)
  rect 3.8x2 smd: 4(0,3.05)
  silkscreen extent -3.35,-3.2 3.3,1.8, body extent -3.25,-3.5 3.25,3.5, height 1.61
SS-12D11G5R_ [mm]
  round 2.8 hole 1.6: 1(0,0) 2(4.8,0) 3(9.6,0) MH1(-1.85,9.2) MH2(11.45,9.2)
  silkscreen extent -1.91,-0.84 11.51,10.21, body extent -1.85,-0.79 11.5,14.9, height 6.85
"Test-point - 0.5mm" [mm]
  oct 1x1 smd: 1(0,0)
  silkscreen extent -0.68,-0.68 0.68,0.68
"TH LED 3mm_" [mm]
  rect 1.6x1.6 hole 0.9: 1(-1.27,0)
  round 1.6 hole 0.9: 2(1.27,0)
  silkscreen extent -1.37,-1.8 2.92,1.8, body extent -1.5,-2 2,2, height 6.25
"TH LED Red 3MM" [mil]
  round 60 hole 35.43 paste+0 mask+2: 1(-50,0) 2(50,0)
  silkscreen extent -85,-82 63,82, body extent -79,-80 61,78, height 205
TS-1109S-C-B [mm]
  rect 1.4x1.1 smd: 1(-3.25,-1.5) 2(3.25,-1.5) 3(3.25,1.5) 4(-3.25,1.5)
  silkscreen extent -2.41,-2.31 2.41,2.31, body extent -3.5,-2.25 3.5,2.25, height 4.3
TXB0102DCUT [mm]
  rect 0.8x0.3 smd: 1(-1.55,0.75) 2(-1.55,0.25) 3(-1.55,-0.25) 4(-1.55,-0.75) 5(1.55,-0.75) 6(1.55,-0.25) 7(1.55,0.25) 8(1.55,0.75)
  silkscreen extent -1.61,-1.04 0.97,1.13, body extent -1.55,-1 1.55,1, height 0.9
"Voltlink Target" [mm]
  rect 0.5x1.6 smd: 1(-2.5,-1.262) 2(-1.5,-1.262) 3(-0.5,-1.262) 4(0.5,-1.262) 5(1.5,-1.262) 6(2.5,-1.262)
  rect 1.2x1.8 smd: MP1(-3.8,1.262) MP2(3.8,1.262)
  silkscreen extent -4.06,-1.68 4.06,2.17, body extent -4,-1.49 4,2.11, height 4.25
VSSOP-8(3.1x2.1) [mm]
  rect 0.8x0.3 smd mask+0.05: 1(-1.55,0.75) 2(-1.55,0.25) 3(-1.55,-0.25) 4(-1.55,-0.75) 5(1.55,-0.75) 6(1.55,-0.25) 7(1.55,0.25) 8(1.55,0.75)
  silkscreen extent -2.24,-1.04 1.07,1.04, body extent -1.55,-1 1.55,1, height 0.88

## Part data
C1 C14 C16 C17 C18 C21 C22 C37 C39 C40 C41 C42 C43 C44 C45 C46 C47 C48 C49 C50: library part CC0603KRX5R9BB104, "CAP CER 0.1UF 50V X5R 0603", Case Code (Imperial)=0603, Case Code (Metric)=1608, Dielectric=X5R, LCSC Part Number=C110022, Manufacturer=Yageo, Max Operating Temperature=85°C, Min Operating Temperature=-55°C, Package Quantity=4000, Supplier Part Number 1=311-4046-1-ND, Tolerance=10%, Voltage Rating=50V, Capacitance=100nF, Case/Package=0603, Category="Ceramic Capacitors", ComponentLink1Description=http://www.mouser.com/ds/2/447/Yageo_UPY-GP_NP0_16V-to-50V_9-358835.pdf?src-supplier=Mouser, ComponentLink1URL=http://www.mouser.com/ds/2/447/Yageo_UPY-GP_NP0_16V-to-50V_9-358835.pdf?src-supplier=Mouser, ComponentLink2Description=https://www.yageo.com/upload/media/product/productsearch/datasheet/mlcc/UPY-GPHC_X5R_4V-to-50V_26.pdf?src-supplier=Digi-Key, ComponentLink2URL=https://www.yageo.com/upload/media/product/productsearch/datasheet/mlcc/UPY-GPHC_X5R_4V-to-50V_26.pdf?src-supplier=Digi-Key, ComponentLink3Description=http://www.yageo.com/exep/pages/download/literatures/ProductSelectionGuide%202014_Final_2.pdf?src-supplier=Digi-Key, ComponentLink3URL=http://www.yageo.com/exep/pages/download/literatures/ProductSelectionGuide%202014_Final_2.pdf?src-supplier=Digi-Key, Halogen Free="Halogen Free", Item Type=Capacitor, Lead Free="Lead Free", Length=0.063inch, Manufacturer Part Number=CC0603KRX5R9BB104, Mount="Surface Mount", Packaging="Tape and Reel", Pricing 1="1=0.10000, 10=0.05200, 50=0.02820, 100=0.02310, 500=0.01648, 1000=0.01294 (USD)", RoHS=Yes, Stock 1=152253, Supplier 1=Digi-Key, Termination=SMD/SMT, Thickness=0.035inch, Voltage Rating (DC)=50V, Weight=7.1E-05oz, Width=0.031inch
C2 C3: library part CC1206KKX5R9BB106, "CAP CER 10UF 50V X5R 1206", Case Code (Imperial)=1206, Case Code (Metric)=3216, Dielectric=X5R, LCSC Part Number=C100122, Manufacturer=Yageo, Max Operating Temperature=85°C, Min Operating Temperature=-55°C, Supplier Part Number=2072123, Tolerance=10%, Voltage Rating=50V, Case/Package=1206, ComponentLink1Description=https://datasheet.octopart.com/CC1206KKX5R9BB106-Yageo-datasheet-170350636.pdf?src-supplier=Future+Electronics, ComponentLink1URL=https://datasheet.octopart.com/CC1206KKX5R9BB106-Yageo-datasheet-170350636.pdf?src-supplier=Future+Electronics, ComponentLink2Description=https://datasheet.octopart.com/CC1206KKX5R9BB106-Yageo-datasheet-145016144.pdf?src-supplier=Future+Electronics, ComponentLink2URL=https://datasheet.octopart.com/CC1206KKX5R9BB106-Yageo-datasheet-145016144.pdf?src-supplier=Future+Electronics, ComponentLink3Description=http://www.yageo.com/documents/recent/UPY-GPHC_X5R_4V-to-50V_25.pdf?src-supplier=Digikey, ComponentLink3URL=http://www.yageo.com/documents/recent/UPY-GPHC_X5R_4V-to-50V_25.pdf?src-supplier=Digikey, Halogen Free="Halogen Free", Height=1.9mm, Item Type=Capacitors, Lead Free="Lead Free", Length=0.126inch, Manufacturer Part Number=CC1206KKX5R9BB106, Material=4241ConductorMaterial, Mounting Technology="Surface Mount", Packaging="Cut Tape", Pricing="2000=0.0907, 6000=0.0872, 10000=0.0856, 30000=0.0823, 50000=0.0795 (USD)", RoHS=Yes, RoHS Compliant=Yes, Series=CC, Stock=220000, Supplier="Future Electronics", Thickness=0.075inch, Voltage Rating (DC)=50V, Width=0.063inch
C4: library part CGA2B2C0G1H391J050BA, "CAP CER 390PF 50V C0G 0402", Manufacturer=TDK, Supplier Part Number=445-5603-1-ND, ComponentLink1Description=https://datasheet.ciiva.com/24219/cga2b2c0g1h391j050ba-265720-24219960.pdf?src-supplier=Mouser, ComponentLink1URL=https://datasheet.ciiva.com/24219/cga2b2c0g1h391j050ba-265720-24219960.pdf?src-supplier=Mouser, ComponentLink2Description=https://datasheet.ciiva.com/7975/1807242-7975259.pdf?src-supplier=Element14, ComponentLink2URL=https://datasheet.ciiva.com/7975/1807242-7975259.pdf?src-supplier=Element14, Item Type=Capacitors, Manufacturer Part Number=CGA2B2C0G1H391J050BA, Pricing="1=0.1, 10=0.048, 50=0.0278, 100=0.0216, 500=0.01622, 1000=0.01275, 2500=0.01159, 5000=0.01066 (USD)", RoHS=Yes, Stock=103846, Supplier=Digikey
C5 C6 C7: library part GRM31CR61E476ME44L, "CAP CER 47UF 25V X5R 1206", Dielectric=X5R, LCSC Part Number=C403725, Manufacturer=Murata, Supplier Part Number 1=490-16268-2-ND, Tolerance=20%, Voltage Rating (DC)=25V, Capacitance=47uF, Category="Ceramic Capacitors", ComponentLink1Description=https://search.murata.co.jp/Ceramy/image/img/A01X/partnumbering_e_01.pdf?src-supplier=Digi-Key, ComponentLink1URL=https://search.murata.co.jp/Ceramy/image/img/A01X/partnumbering_e_01.pdf?src-supplier=Digi-Key, Item Type=Capacitor, Length=3.2mm, Manufacturer Part Number=GRM31CR61E476ME44L, RoHS=Yes, Supplier 1=Digi-Key, Thickness=1.6mm, Width=1.6mm
C8: library part CC0402KRX7R9BB473, "CAP CER 0.047UF 50V X7R 0402", Case Code (Imperial)=0402, Case Code (Metric)=1005, Dielectric=1511DielectricType, LCSC Part Number=C272875, Manufacturer=Yageo, Max Operating Temperature=125°C, Min Operating Temperature=-55°C, Supplier Part Number=2095687, Temperature Coefficient=30ppm/°C, Tolerance=10%, Voltage Rating=50V, Case/Package=0402, Category="Ceramic Capacitors", ComponentLink1Description=https://datasheet.octopart.com/CC0402KRX7R9BB473-Yageo-datasheet-166511530.pdf?src-supplier=Future+Electronics, ComponentLink1URL=https://datasheet.octopart.com/CC0402KRX7R9BB473-Yageo-datasheet-166511530.pdf?src-supplier=Future+Electronics, ComponentLink2Description=http://www.yageo.com/documents/recent/UPY-GPHC_X7R_6.3V-to-50V_18.pdf?src-supplier=Digikey, ComponentLink2URL=http://www.yageo.com/documents/recent/UPY-GPHC_X7R_6.3V-to-50V_18.pdf?src-supplier=Digikey, ComponentLink3Description=https://datasheet.octopart.com/CC0402KRX7R9BB473-Yageo-datasheet-140260305.pdf?src-supplier=Newark, ComponentLink3URL=https://datasheet.octopart.com/CC0402KRX7R9BB473-Yageo-datasheet-140260305.pdf?src-supplier=Newark, Halogen Free=5694HalogenFree, Height=550um, Item Type=Capacitor, Lead Free=5697LeadFree, Length=0.039inch, Manufacturer Part Number=CC0402KRX7R9BB473, Material=4241ConductorMaterial, Mounting Technology="Surface Mount", Packaging="Tape and Reel", Pricing="10000=0.0044, 40000=0.0042, 100000=0.004, 150000=0.0041, 250000=0.0039, 400000=0.0037, 500000=0.0038 (USD)", RoHS=Yes, RoHS Compliant=Yes, Series=CC, Stock=1130000, Supplier="Future Electronics", Thickness=0.022inch, Voltage Rating (DC)=50V, Width=0.02inch
C9 C10 C15: library part CL10A105KB8NNNC, "CAP CER 1UF 50V X5R 0603", Case Code (Imperial)=0603, Case Code (Metric)=1608, Dielectric=X5R, LCSC Part Number=C15849, Manufacturer=Samsung, Max Operating Temperature=85°C, Min Operating Temperature=-55°C, Tolerance=10%, Voltage Rating=50V, Case/Package=0603, Category="Ceramic Capacitors", ComponentLink1Description=https://datasheet.ciiva.com/26877/getdatasheetpartid-753736-26877879.pdf?src-supplier=Verical, ComponentLink1URL=https://datasheet.ciiva.com/26877/getdatasheetpartid-753736-26877879.pdf?src-supplier=Verical, Depth=0.8mm, Item Type=Capacitor, Length=1.6mm, Manufacturer Part Number=CL10A105KB8NNNC, Material=4241ConductorMaterial, Mounting Technology="Surface Mount", Packaging="Tape and Reel", Pricing="4000=0.01632, 8000=0.01595, 16000=0.01557, 24000=0.0152, 32000=0.01482 (USD)", Radiation Hardening=No, RoHS=Yes, RoHS Compliant=Yes, Series=CL, Stock=780446, Supplier=Avnet, Supplier Part Number=CL10A105KB8NNNC, Voltage Rating (DC)=50V
C11: library part CC0603KRX5R7BB475, "CAP CER 4.7UF 16V X5R 0603", Case Code (Imperial)=0603, Case Code (Metric)=1608, Dielectric=X5R, LCSC Part Number=C277476, Manufacturer=Yageo, Max Operating Temperature=85°C, Min Operating Temperature=-55°C, Resistor Type=Ceramic, Supplier Part Number 1=311-1785-1-ND, Tolerance=10%, Voltage Rating=16V, Capacitance=4.7uF, Case/Package=0603, Category="Ceramic Capacitors", ComponentLink1Description=http://www.mouser.com/ds/2/447/UPY-GPHC_X5R_4V-to-50V_25-1131599.pdf?src-supplier=Mouser, ComponentLink1URL=http://www.mouser.com/ds/2/447/UPY-GPHC_X5R_4V-to-50V_25-1131599.pdf?src-supplier=Mouser, ComponentLink2Description=http://www.yageo.com/documents/recent/UPY-GPHC_X5R_4V-to-50V_25.pdf?src-supplier=Digi-Key, ComponentLink2URL=http://www.yageo.com/documents/recent/UPY-GPHC_X5R_4V-to-50V_25.pdf?src-supplier=Digi-Key, Depth=0.8mm, Halogen Free="Halogen Free", Height=0.8mm, Item Type=Capacitor, Lead Free="Lead Free", Length=1.6mm, Manufacturer Part Number=CC0603KRX5R7BB475, Mount="Surface Mount", Packaging="Tape and Reel", Pricing 1="1=0.20000, 10=0.13800, 50=0.08280, 100=0.06990, 500=0.04784, 1000=0.04233 (USD)", RoHS=Yes, RoHS Compliant=Yes, Series=CC, Stock 1=547703, Supplier 1=Digi-Key, Termination=SMD/SMT, Thickness=0.037inch, Voltage Rating (DC)=16V, Weight=7.1E-05oz, Width=0.8mm
C12: library part RVT1H470M0607, "47uF 50V 66mA@120Hz ±20% SMD,D6.3xL7.7mm Aluminum Electrolytic Capacitors - SMD ROHS", LCSC Part Number=C72523, Manufacturer=ROQANG, Package=SMD,D6.3xL7.7mm, ComponentLink1Description=LCSC, ComponentLink1URL=https://www.lcsc.com/product-detail/Aluminum-Electrolytic-Capacitors-SMD_ROQANG-RVT1H470M0607_C72523.html, Item Type=Capacitor, Manufacturer Part Number=RVT1H470M0607
C13 C38: library part CC0603MRX5R6BB226, "CAP CER 22UF 10V X5R 0603", Case Code (Imperial)=0603, Case Code (Metric)=1608, Dielectric=X5R, LCSC Part Number=C109447, Manufacturer=Yageo, Max Operating Temperature=85°C, Min Operating Temperature=-55°C, Package Quantity=4000, Supplier Part Number 1=311-1819-1-ND, Tolerance=20%, Voltage Rating=10V, Capacitance=22uF, Case/Package=0603, Category="Ceramic Capacitors", ComponentLink1Description=http://www.mouser.com/ds/2/447/Yageo_UPY-GP_NP0_16V-to-50V_9-358835.pdf?src-supplier=Mouser, ComponentLink1URL=http://www.mouser.com/ds/2/447/Yageo_UPY-GP_NP0_16V-to-50V_9-358835.pdf?src-supplier=Mouser, ComponentLink2Description=http://www.yageo.com/documents/recent/UPY-GPHC_X5R_4V-to-50V_25.pdf?src-supplier=Digi-Key, ComponentLink2URL=http://www.yageo.com/documents/recent/UPY-GPHC_X5R_4V-to-50V_25.pdf?src-supplier=Digi-Key, Halogen Free="Halogen Free", Height=0.8mm, Lead Free="Lead Free", Length=0.063inch, Manufacturer Part Number=CC0603MRX5R6BB226, Mount="Surface Mount", Packaging="Tape and Reel", Pricing 1="1=0.68000, 10=0.48000, 50=0.36300, 100=0.31610, 500=0.23416, 1000=0.19903 (USD)", RoHS=Yes, RoHS Compliant=Yes, Stock 1=19628, Supplier 1=Digi-Key, Termination=SMD/SMT, Thickness=0.035inch, Voltage Rating (DC)=10V, Weight=7.1E-05oz, Width=0.8mm
C19 C20: library part TAJE107M025RNJ, "CAP TANT 100UF 20% 25V 2917", Case Code (Imperial)=2917, Case Code (Metric)=7343, ESR (Equivalent Series Resistance)=300mR, LCSC Part Number=C7230, Leakage Current=25uA, Manufacturer="Kyocera AVX", Max Operating Temperature=125°C, Min Operating Temperature=-55°C, Package Quantity=1, Supplier Part Number 1=581-TAJE107M025RNJ, Tolerance=20%, Voltage Rating=25V, Capacitance=100uF, Case/Package=2917, Category="Tantalum Capacitors", ComponentLink1Description=https://datasheet.ciiva.com/26787/taje107m025rnj-26787048.pdf?src-supplier=IIIC, ComponentLink1URL=https://datasheet.ciiva.com/26787/taje107m025rnj-26787048.pdf?src-supplier=IIIC, ComponentLink2Description=https://datasheet.ciiva.com/265/taj-265541.pdf?src-supplier=Digi-Key, ComponentLink2URL=https://datasheet.ciiva.com/265/taj-265541.pdf?src-supplier=Digi-Key, ComponentLink3Description=https://datasheet.ciiva.com/265/taj-265542.pdf?src-supplier=Digi-Key, ComponentLink3URL=https://datasheet.ciiva.com/265/taj-265542.pdf?src-supplier=Digi-Key, ComponentLink4Description=https://datasheet.ciiva.com/265/taj-265540.pdf?src-supplier=Digi-Key, ComponentLink4URL=https://datasheet.ciiva.com/265/taj-265540.pdf?src-supplier=Digi-Key, ComponentLink5Description=https://datasheet.ciiva.com/28609/1719052-28609254.pdf?src-supplier=Element14, ComponentLink5URL=https://datasheet.ciiva.com/28609/1719052-28609254.pdf?src-supplier=Element14, ComponentLink6Description=https://datasheet.ciiva.com/11230/taj-11230456.pdf?src-supplier=Avnet, ComponentLink6URL=https://datasheet.ciiva.com/11230/taj-11230456.pdf?src-supplier=Avnet, ComponentLink7Description=https://datasheet.ciiva.com/17339/taj-17339677.pdf?src-supplier=Avnet+Europe, ComponentLink7URL=https://datasheet.ciiva.com/17339/taj-17339677.pdf?src-supplier=Avnet+Europe, ComponentLink8Description=https://datasheet.ciiva.com/22667/1719052-22667581.pdf?src-supplier=Element14, ComponentLink8URL=https://datasheet.ciiva.com/22667/1719052-22667581.pdf?src-supplier=Element14, Construction=Flat, Depth=4.3mm, Dissipation Factor=10%, Features="General Purpose", Height=4.3mm, Height - Seated (Max)=0.169inch, Lead Free="Lead Free", Length=7.3mm, Manufacturer Part Number=TAJE107M025RNJ, Mount="Surface Mount", Number of Pins=2, Packaging="Tape and Reel", Polarity=Polar, Pricing 1="1=2.81000, 10=2.81000, 50=2.81000, 100=2.19000, 1000=1.76000, 10000=1.76000 (USD)", Radiation Hardening=No, REACH SVHC="No SVHC", RoHS=Yes, RoHS Compliant=Yes, Series=TAJ, Stock 1=109, Supplier 1=Mouser, Termination=SMD/SMT, Voltage Rating (DC)=25V, Width=4.3mm
C23 C24: library part CC0603KRX7R9BB474, "CAP CER 0.47 uF, 50 V, ± 10%, X7R, 0603 [1608 Metric]", Dielectric=1511DielectricType, LCSC Part Number=C513577, Manufacturer=Yageo, Max Operating Temperature=125°C, Min Operating Temperature=-55°C, Package=0603, Supplier Part Number=3124150, Voltage Rating=50V, Category="Ceramic Capacitors", ComponentLink1Description=https://datasheet.octopart.com/CC0603KRX7R9BB474-Yageo-datasheet-147453679.pdf?src-supplier=Newark, ComponentLink1URL=https://datasheet.octopart.com/CC0603KRX7R9BB474-Yageo-datasheet-147453679.pdf?src-supplier=Newark, ComponentLink2Description=https://datasheet.octopart.com/CC0603KRX7R9BB474-Yageo-datasheet-166511530.pdf?src-supplier=Future+Electronics, ComponentLink2URL=https://datasheet.octopart.com/CC0603KRX7R9BB474-Yageo-datasheet-166511530.pdf?src-supplier=Future+Electronics, ComponentLink3Description=https://datasheet.octopart.com/CC0603KRX7R9BB474-Yageo-datasheet-151948686.pdf?src-supplier=Farnell, ComponentLink3URL=https://datasheet.octopart.com/CC0603KRX7R9BB474-Yageo-datasheet-151948686.pdf?src-supplier=Farnell, ComponentLink4Description=LCSC, ComponentLink4URL=https://www.lcsc.com/product-detail/Multilayer-Ceramic-Capacitors-MLCC-SMD-SMT_YAGEO-CC0603KRX7R9BB474_C513577.html, Halogen Free=5694HalogenFree, Height=900um, Item Type=Capacitor, Lead Free=5697LeadFree, Manufacturer Part Number=CC0603KRX7R9BB474, Material=4241ConductorMaterial, Pricing="4000=0.0623, 8000=0.0607, 12000=0.0598, 16000=0.0591, 20000=0.0571 (USD)", RoHS=Yes, RoHS Compliant=Yes, Stock=44000, Supplier="Future Electronics", Voltage Rating (DC)=50V
C25: library part CC0603KRX7R9BB223, "CAP CER 0.022UF 50V X7R 0603", Case Code (Imperial)=0603, Case Code (Metric)=1608, Dielectric=X7R, Dielectric Material=Ceramic, Insulation Resistance=100GR, LCSC Part Number=C106222, Manufacturer=Yageo, Max Operating Temperature=125°C, Min Operating Temperature=-55°C, Package Quantity=1, Supplier Part Number 1=311-1370-1-ND, Tolerance=10%, Voltage=50V, Capacitance=22nF, Case/Package=0603, Category="Ceramic Capacitors", ComponentLink1Description=https://datasheet.ciiva.com/8033/70765-8033869.pdf?src-supplier=Element14, ComponentLink1URL=https://datasheet.ciiva.com/8033/70765-8033869.pdf?src-supplier=Element14, ComponentLink2Description=https://datasheet.ciiva.com/28450/1489800-28450639.pdf?src-supplier=Element14, ComponentLink2URL=https://datasheet.ciiva.com/28450/1489800-28450639.pdf?src-supplier=Element14, ComponentLink3Description=https://datasheet.ciiva.com/8033/1489800-8033867.pdf?src-supplier=Element14, ComponentLink3URL=https://datasheet.ciiva.com/8033/1489800-8033867.pdf?src-supplier=Element14, ComponentLink4Description=https://datasheet.ciiva.com/8033/1489800-8033865.pdf?src-supplier=Element14, ComponentLink4URL=https://datasheet.ciiva.com/8033/1489800-8033865.pdf?src-supplier=Element14, ComponentLink5Description=https://datasheet.ciiva.com/156/mlccorderingcode-156178.pdf?src-supplier=Digi-Key, ComponentLink5URL=https://datasheet.ciiva.com/156/mlccorderingcode-156178.pdf?src-supplier=Digi-Key, ComponentLink6Description=https://datasheet.ciiva.com/156/mlccorderingcode-156177.pdf?src-supplier=Digi-Key, ComponentLink6URL=https://datasheet.ciiva.com/156/mlccorderingcode-156177.pdf?src-supplier=Digi-Key, ComponentLink7Description=https://datasheet.ciiva.com/156/mlccorderingcode-156179.pdf?src-supplier=Digi-Key, ComponentLink7URL=https://datasheet.ciiva.com/156/mlccorderingcode-156179.pdf?src-supplier=Digi-Key, ComponentLink8Description=https://datasheet.ciiva.com/11464/upy-gphc-x7r-6-3v-to-50v-8-11464741.pdf?src-supplier=Avnet, ComponentLink8URL=https://datasheet.ciiva.com/11464/upy-gphc-x7r-6-3v-to-50v-8-11464741.pdf?src-supplier=Avnet, Depth=0.8mm, Halogen Free="Halogen Free", Height=0.8mm, Item Type=Capacitor, Lead Free="Lead Free", Length=1.6mm, Manufacturer Part Number=CC0603KRX7R9BB223, Mount="Surface Mount", Number of Pins=2, Packaging="Tape and Reel", Pricing 1="1=0.10000, 10=0.05500, 50=0.03020, 100=0.02460, 500=0.01760, 1000=0.01383 (USD)", Radiation Hardening=No, REACH SVHC="No SVHC", Resistor Type=Ceramic, RoHS=Yes, RoHS Compliant=Yes, Series=CC, Stock 1=119735, Supplier 1=Digi-Key, Termination=SMD/SMT, Thickness=0.035inch, Voltage Rating=50V, Voltage Rating (DC)=50V, Width=0.031inch
C26 C27 C29 C30: library part CC0603KRX7R9BB224, "CAP CER 0.22 uF, 50 V, ± 10%, X7R, 0603 [1608 Metric]", Case Code (Imperial)=0603, Case Code (Metric)=1608, LCSC Part Number=C107083, Manufacturer=Yageo, Max Operating Temperature=125°C, Min Operating Temperature=-55°C, Supplier Part Number=8068995, Tolerance=10%, Voltage Rating=50V, Case/Package=0603, Category="Ceramic Capacitors", ComponentLink1Description=http://www.yageo.com/documents/recent/UPY-GPHC_X7R_6.3V-to-50V_18.pdf?src-supplier=Digi-Key, ComponentLink1URL=http://www.yageo.com/documents/recent/UPY-GPHC_X7R_6.3V-to-50V_18.pdf?src-supplier=Digi-Key, ComponentLink2Description=https://www.yageo.com/upload/media/product/productsearch/datasheet/mlcc/UPY-GPHC_X7R_6.3V-to-50V_18.pdf?src-supplier=Digi-Key, ComponentLink2URL=https://www.yageo.com/upload/media/product/productsearch/datasheet/mlcc/UPY-GPHC_X7R_6.3V-to-50V_18.pdf?src-supplier=Digi-Key, ComponentLink3Description=https://datasheet.octopart.com/CC0603KRX7R9BB224-Yageo-datasheet-140260305.pdf?src-supplier=Newark, ComponentLink3URL=https://datasheet.octopart.com/CC0603KRX7R9BB224-Yageo-datasheet-140260305.pdf?src-supplier=Newark, ComponentLink4Description=https://datasheet.octopart.com/CC0603KRX7R9BB224-Yageo-datasheet-137700082.pdf?src-supplier=Future+Electronics, ComponentLink4URL=https://datasheet.octopart.com/CC0603KRX7R9BB224-Yageo-datasheet-137700082.pdf?src-supplier=Future+Electronics, ComponentLink5Description=https://datasheet.octopart.com/CC0603KRX7R9BB224-Yageo-datasheet-166511530.pdf?src-supplier=Future+Electronics, ComponentLink5URL=https://datasheet.octopart.com/CC0603KRX7R9BB224-Yageo-datasheet-166511530.pdf?src-supplier=Future+Electronics, ComponentLink6Description=LCSC, ComponentLink6URL=https://www.lcsc.com/product-detail/Multilayer-Ceramic-Capacitors-MLCC-SMD-SMT_YAGEO-CC0603KRX7R9BB224_C107083.html, Halogen Free="Halogen Free", Height=900um, Item Type=Capacitor, Lead Free="Lead Free", Length=0.063inch, Manufacturer Part Number=CC0603KRX7R9BB224, Material=4241ConductorMaterial, Mounting Technology="Surface Mount", Packaging="Cut Tape", Pricing="4000=0.0134, 12000=0.013, 40000=0.0125, 80000=0.0122, 160000=0.0117 (USD)", RoHS=Yes, RoHS Compliant=Yes, Series=CC, Stock=1468000, Supplier="Future Electronics", Thickness=0.035inch, Voltage Rating (DC)=50V, Width=0.031inch
C28 C31 C32 C33: library part CL10B102KC8NNNC, "CAP CER 1nF 100V X7R 0603", Case Code (Imperial)=0603, Case Code (Metric)=1608, Dielectric=X7R, LCSC Part Number=C153291, Manufacturer=Samsung, Max Operating Temperature=125°C, Min Operating Temperature=-55°C, Package Quantity=1, Tolerance=10%, Voltage=100V, Capacitance=1nF, Case/Package=0603, Category="Ceramic Capacitors", ComponentLink1Description=https://datasheet.ciiva.com/25799/cl10b102kc8nnnc-25799476.pdf?src-supplier=Digi-Key, ComponentLink1URL=https://datasheet.ciiva.com/25799/cl10b102kc8nnnc-25799476.pdf?src-supplier=Digi-Key, ComponentLink2Description=https://datasheet.ciiva.com/29198/458286-da-01-en-vs-kondensator-0603-29198496.pdf?src-supplier=Conrad, ComponentLink2URL=https://datasheet.ciiva.com/29198/458286-da-01-en-vs-kondensator-0603-29198496.pdf?src-supplier=Conrad, ComponentLink3Description=https://datasheet.ciiva.com/26838/getdatasheetpartid-640779-26838395.pdf?src-supplier=Verical, ComponentLink3URL=https://datasheet.ciiva.com/26838/getdatasheetpartid-640779-26838395.pdf?src-supplier=Verical, ComponentLink4Description=https://datasheet.ciiva.com/26310/mlcc-catalogdownload2013-eng-26310266.pdf?src-supplier=Distrelec, ComponentLink4URL=https://datasheet.ciiva.com/26310/mlcc-catalogdownload2013-eng-26310266.pdf?src-supplier=Distrelec, ComponentLink5Description=https://datasheet.ciiva.com/16199/cl05b104kq5nnnc-16199246.pdf?src-supplier=Future+Electronics, ComponentLink5URL=https://datasheet.ciiva.com/16199/cl05b104kq5nnnc-16199246.pdf?src-supplier=Future+Electronics, Construction=Flat, Contact Plating=Tin, Depth=0.8mm, Height=0.8mm, Lead Free="Lead Free", Length=1.6mm, Manufacturer Part Number=CL10B102KC8NNNC, Material=Ceramic, Mount="Surface Mount", Packaging="Tape and Reel", Pricing 1="4000=0.00988, 8000=0.00987, 16000=0.00986, 24000=0.00985, 32000=0.00984, 40000=0.00982, 400000=0.00981 (USD)", Radiation Hardening=No, RoHS=Yes, RoHS Compliant=Yes, Series=CL, Stock 1=184000, Supplier 1=Avnet, Supplier Part Number 1=CL10B102KC8NNNC, Thickness=0.035inch, Voltage Rating=100V, Voltage Rating (DC)=100V, Width=0.031inch
C34 C35: library part CC0603KRX5R8BB225, "CAP CER 2.2UF 25V X5R 0603", Case Code (Imperial)=0603, Case Code (Metric)=1608, Dielectric=X5R, LCSC Part Number=C309478, Manufacturer=Yageo, Max Operating Temperature=85°C, Min Operating Temperature=-55°C, Package Quantity=4000, Resistor Type=Ceramic, Supplier Part Number 1=311-1786-1-ND, Tolerance=10%, Voltage Rating=25V, Capacitance=2.2uF, Case/Package=0603, ComponentLink1Description=https://www.verical.com/server-webapp/html/getDatasheet?partID=782757&src-supplier=Verical, ComponentLink1URL=https://www.verical.com/server-webapp/html/getDatasheet?partID=782757&src-supplier=Verical, Depth=0.8mm, Halogen Free="Halogen Free", Item Type=Capacitor, Lead Free="Lead Free", Length=1.6mm, Manufacturer Part Number=CC0603KRX5R8BB225, Mount="Surface Mount", Packaging="Tape and Reel", Pricing 1="1=0.4, 10=0.276, 50=0.1932, 100=0.1656, 500=0.1242, 1000=0.10488 (USD)", Radiation Hardening=No, RoHS Compliant=Yes, Stock 1=687936, Supplier 1=Digi-Key, Termination=SMD/SMT, Thickness=0.037inch, Voltage Rating (DC)=25V, Weight=7.1E-05oz, Width=0.031inch
C36: library part CC0603KRX5R9BB474, "CAP CER 0.47UF 50V X5R 0603", Capacitance=470nF, Case/Package=0603, Dielectric=X5R, LCSC Part Number=C513651, Manufacturer=Yageo, Max Operating Temperature=85°C, Min Operating Temperature=-55°C, Supplier Part Number 1=311-4047-1-ND, Tolerance=10%, Voltage Rating=50V, Category="Ceramic Capacitors", ComponentLink1Description="https://www.mouser.com/ds/2/447/ProductSelectionGuide 2014_Final_2-1131690.pdf?src-supplier=Mouser", ComponentLink1URL="https://www.mouser.com/ds/2/447/ProductSelectionGuide 2014_Final_2-1131690.pdf?src-supplier=Mouser", ComponentLink2Description=http://www.yageo.com/documents/recent/UPY-GPHC_X5R_4V-to-50V_25.pdf?src-supplier=Digi-Key, ComponentLink2URL=http://www.yageo.com/documents/recent/UPY-GPHC_X5R_4V-to-50V_25.pdf?src-supplier=Digi-Key, ComponentLink3Description=http://www.yageo.com/exep/pages/download/literatures/ProductSelectionGuide%202014_Final_2.pdf?src-supplier=Digi-Key, ComponentLink3URL=http://www.yageo.com/exep/pages/download/literatures/ProductSelectionGuide%202014_Final_2.pdf?src-supplier=Digi-Key, Halogen Free="Halogen Free", Item Type=Capacitor, Lead Free="Lead Free", Length=0.063inch, Manufacturer Part Number=CC0603KRX5R9BB474, Mount="Surface Mount", Packaging="Tape and Reel", Pricing 1="1=0.45000, 10=0.31400, 50=0.22000, 100=0.18860, 500=0.14144, 1000=0.11944 (USD)", RoHS=Yes, RoHS Compliant=Yes, Stock 1=15145, Supplier 1=Digi-Key, Thickness=0.035inch, Voltage Rating (DC)=50V, Width=0.031inch
D1: "DIODE SCHOTTKY 60V 5A SMA", LCSC Par Number=C65009, Manufacturer=MDD, ComponentLink1Description=LCSC, ComponentLink1URL=https://www.lcsc.com/product-detail/Schottky-Barrier-Diodes-SBD_MDD-Microdiode-Electronics-SS56_C65009.html, Iterm Type=Diode, Manufacturer Part Number=SS56
D2: "20.1A 19.9V 13.3V 12V SMA(DO-214AC) Electrostatic and Surge Protection (TVS/ESD) ROHS", LCSC Part Number=C110042, Manufacturer=MDD, Package=SMA(DO-214AC), ComponentLink1Description=LCSC, ComponentLink1URL=https://www.lcsc.com/product-detail/Electrostatic-and-Surge-Protection-TVS-ESD_MDD-Microdiode-Semiconductor-SMAJ12CA_C110042.html, Item Type=(TVS/ESD), Manufacturer Part Number=SMAJ12CA
D3: "DIODE SCHOTTKY 40V 5A SMC", Average Rectified Current=5A, Case/Package=SMC, Forward Voltage=550mV, LCSC Part Number=C72264, Manufacturer=Diodes, Max Forward Surge Current (Ifsm)=100A, Max Operating Temperature=125°C, Max Repetitive Reverse Voltage (Vrrm)=40V, Max Reverse Current=500uA, Min Operating Temperature=-55°C, Package Quantity=3000, Supplier Part Number=8485369, Category="Rectifier Diodes", Current=5A, Current Rating=5A, Forward Current=5A, Height=2.5mm, Item Type=Diode, Lead Free="Lead Free", Length=7.11mm, Manufacturer Part Number=B540C-13-F, Max Reverse Voltage (DC)=40V, Mounting Technology="Surface Mount", Output Current=5A, Packaging="Tape and Reel", Polarity=Standard, Pricing="3000=0.148, 6000=0.145, 9000=0.143, 12000=0.142, 15000=0.138 (USD)", RoHS=Yes, RoHS Compliant=Yes, Series=-, Stock=381000, Supplier="Future Electronics", Termination=SMD/SMT, Voltage=40V, Voltage Rating (DC)=40V, Weight=0.007408oz, Width=6.22mm
D4: "TVS DIODE 5VWM 9.2VC SMA", LCSC Part Number=Diode, Manufacturer=FTR, Package=SMA(DO-214AC), ComponentLink1Description=LCSC, ComponentLink1URL=https://www.lcsc.com/product-detail/TVS_GOODWORK-SMAJ5-0CA_C908809.html, Item Type=C693487, Manufacturer Part Number=SMAJ5.0CA